# Altium PCB MLX_Thermometer.PcbDoc
Units mm, origin at the board's own origin, x right, y up, seen from the top; angles counter-clockwise.
Board outline 25.04 x 51.52 mm, 2 copper layers (Top Layer, Bottom Layer); 87 components, 49 nets, 275 pads, 164 vias.
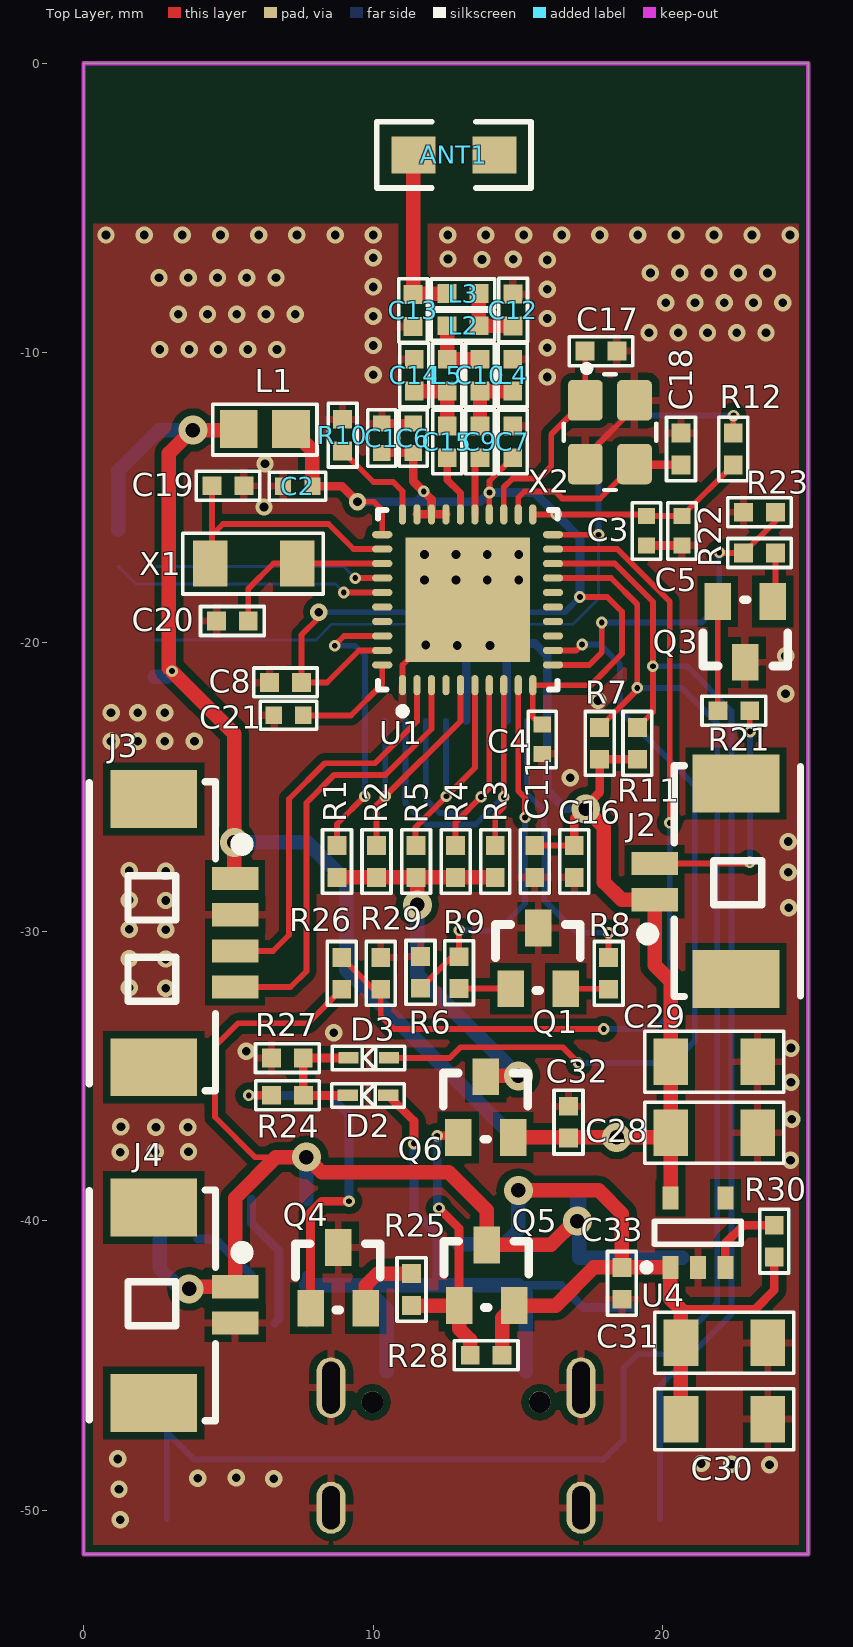
[diagram p0: Top Layer view]
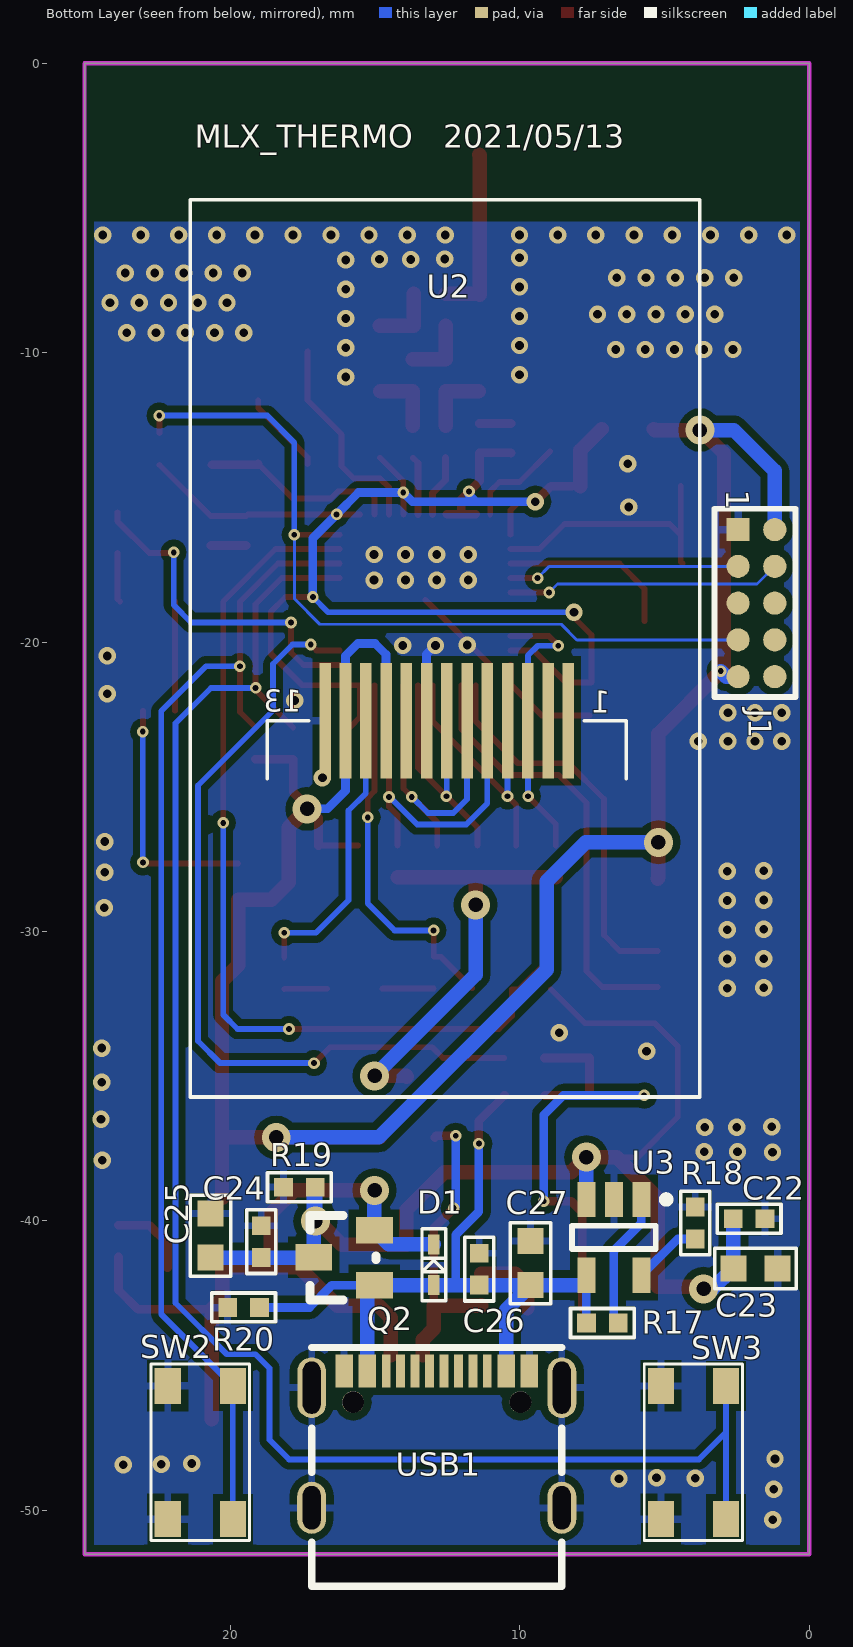
[diagram p1: Bottom Layer view, seen from below]
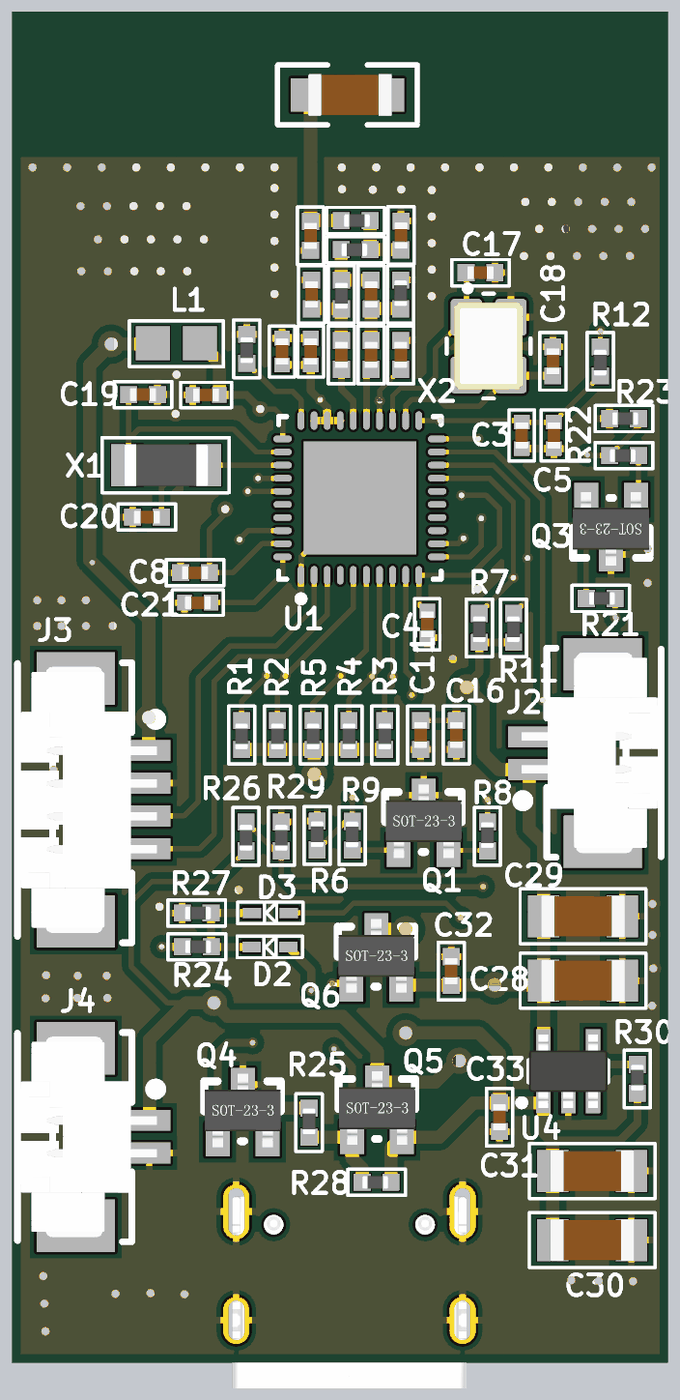
[diagram p2: 3D render of the assembled board from above, using the file's embedded part models]
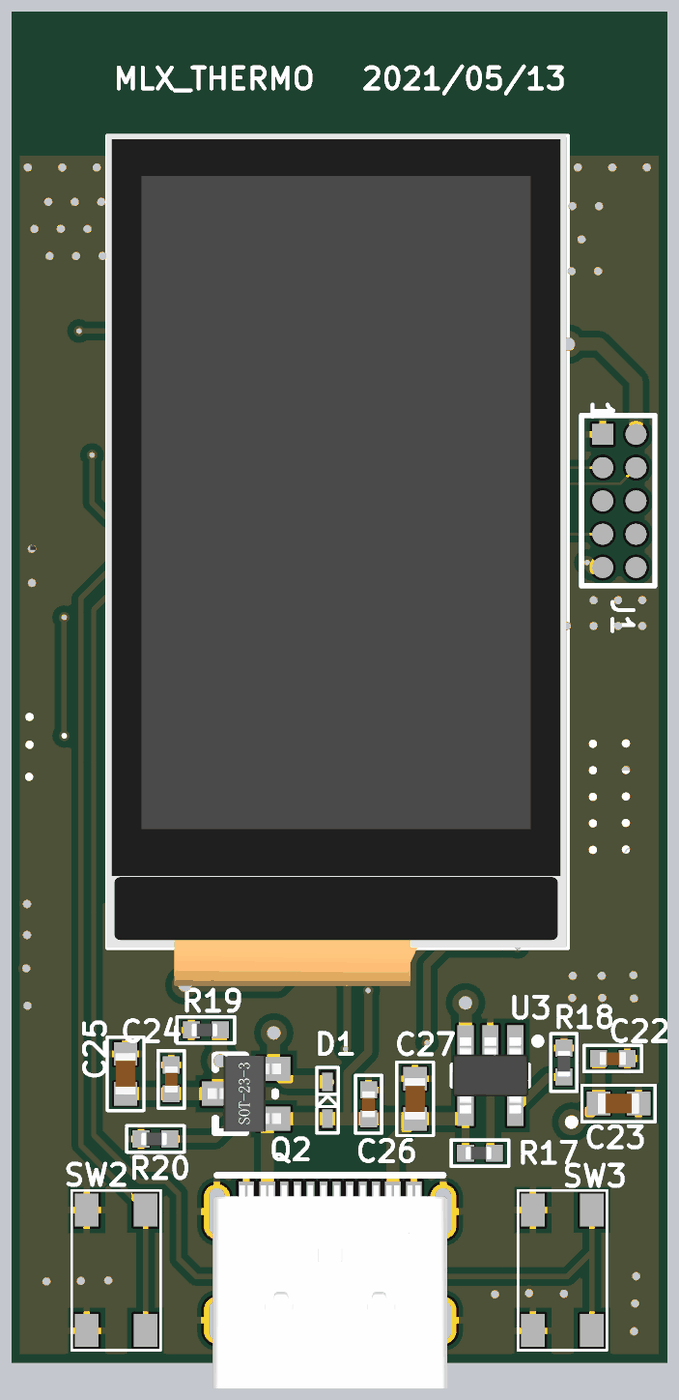
[diagram p3: 3D render of the assembled board from below, using the file's embedded part models]

## Layer stack, top to bottom
Top Solder: solder mask 0.0102, Solder Resist, Dk 3.5
Top Layer: signal copper 0.0356
Dielectric 1: dielectric 0.32, FR-4, Dk 4.8
Bottom Layer: signal copper 0.0356
Bottom Solder: solder mask 0.0102, Solder Resist, Dk 3.5

## Board outline
0,-51.52 25.04,-51.52 25.04,0 0,0

## Design rules (kind name [scope] priority, off if disabled: settings)
Clearance Clearance_poly [InPoly] p1: gap=0.25
Clearance [All] p2: gap=0.1
HoleToHoleClearance [All] p1: gap=0 allowstackedmicrovias=TRUE
MinimumSolderMaskSliver [All] p1: minsoldermaskwidth=0
PolygonConnect PolygonConnect_via [IsVia] p1: connectstyle=Direct reliefconductorwidth=0.254 reliefentries=4 polygonreliefangle="90 Angle" airgapwidth=0.254
PolygonConnect [All] p2: connectstyle=Relief reliefconductorwidth=0.254 reliefentries=4 polygonreliefangle="90 Angle" airgapwidth=0.254
RoutingVias [All] p1: holewidth=0.3 width=0.6 viastyle="Through Hole" minholewidth=0.2 minwidth=0.4 maxholewidth=0.711 maxwidth=1.27
SilkToSilkClearance [All] p1: silktosilkclearance=0
SilkToSolderMaskClearance [IsPad] p1: minsilkscreentomaskgap=0 clearancetoexposedcopper=TRUE
SolderMaskExpansion [All] p1: expansion=0.102
Width [All] p1: maxlimit=1 minlimit=0.1 preferedwidth=0.254
26 further rules are at their usual default settings.

## Components (designator, comment, footprint, x,y, rotation, side; value= is the part's Value field where it differs from the comment)
ANT1 "AN3216" AN3216 12.795,-3.17 r180 top
C1 "1uF" CAP-0402 10.3,-13.466 r90 top
C2 "100nF" CAP-0402 7.905,-14.615 r180 top
C3 "100nF" CAP-0402 19.45,-15.65 r270 top
C4 "100nF" CAP-0402 15.845,-22.853 r270 top
C5 "100nF" CAP-0402 20.675,-15.65 r270 top
C6 "100nF" CAP-0402 11.395,-13.465 r90 top
C7 "220pF" CAP_0402 14.83,-13.085 r90 top
C8 "2.2uF" CAP_0402 6.975,-21.395 r0 top
C9 "18pF" CAP_0402 13.697,-13.085 r90 top
C10 "1pF" CAP_0402 13.697,-10.78 r90 top
C11 "100nF" CAP_0402 15.588,-27.585 r90 top
C12 "1pF" CAP_0402 14.84,-8.53 r270 top
C13 "NC" CAP_0402 11.385,-8.545 r90 top
C14 "1pF" CAP_0402 11.425,-10.78 r90 top
C15 "18pF" CAP_0402 12.564,-13.085 r90 top
C16 "100nF" CAP_0402 16.955,-27.585 r90 top
C17 "27pF" CAP_0402 17.875,-9.95 r180 top
C18 "27pF" CAP_0402 20.64,-13.33 r270 top
C19 "15pF" CAP_0402 4.99,-14.6 r180 top
C20 "15pF" CAP_0402 5.14,-19.275 r0 top
C21 "100nF" CAP-0402 6.574,-22.535 r0 top
C22 "100nF" CAP_0402 2.075,-39.925 r0 bottom
C23 "10uF/16V" CAP-0603 1.095,-41.64 r0 bottom
C24 "100nF" CAP_0402 18.935,-40.72 r270 bottom
C25 "10uF/16V" CAP-0603 20.68,-39.746 r270 bottom
C26 "100nF" CAP_0402 11.4,-41.67 r270 bottom
C27 "10uF/16V" CAP-0603 9.625,-40.696 r270 bottom
C28 "47uF/16V" CAP-1206 21.79,-36.955 r0 top
C29 "22uF/16V" CAP-1206 21.79,-34.5 r0 top
C30 "47uF/16V" CAP-1206 22.14,-46.85 r0 top
C31 "22uF/16V" CAP-1206 22.14,-44.215 r0 top
C32 "100nF" CAP_0402 16.755,-36.59 r270 top
C33 "100nF" CAP_0402 18.6,-42.16 r90 top
D1 "1N5819" SOD523 12.97,-41.58 r90 bottom
D2 "1N4148" SOD523-3D 10.53,-35.665 r180 top
D3 "1N4148" SOD523-3D 10.55,-34.37 r180 top
J1 "DEBUG" HEADER2X5 2.46,-18.655 r270 bottom
J2 "Buzzer" "MX 1.25-WS-2P" 22.54,-28.265 r90 top
J3 "MLX" "MX 1.25-WS-4P" 2.425,-30.06 r270 top
J4 "Battery" "MX 1.25-WS-2P" 2.425,-42.915 r270 top
L1 "30R/600mA" IND_0805_SMD 6.265,-12.64 r180 top
L2 "1nH" Inductor_0402_3D 13.11,-9.075 r0 top
L3 "1nH" Inductor_0402_3D 13.11,-7.96 r180 top
L4 "2nH" Inductor_0402_3D 14.83,-10.78 r270 top
L5 "2nH" Inductor_0402_3D 12.564,-10.78 r90 top
Q1 "S8050" SOT23_2 14.735,-31.895 r0 top
Q2 "Si2307" SOT23_2 15.113,-42.238 r90 bottom
Q3 "2SC2712" SOT23_2 23.83,-18.69 r180 top
Q4 "PMBT3904" SOT23_2 7.824,-42.93 r0 top
Q5 "Si2301" SOT23_2 12.955,-42.84 r0 top
Q6 "Si2301" SOT23_2 12.924,-37.03 r0 top
R1 "10K" RES_0402 8.755,-27.585 r90 top
R2 "10K" RES_0402 10.122,-27.585 r90 top
R3 "10K" RES_0402 14.222,-27.585 r90 top
R4 "10K" RES_0402 12.855,-27.585 r90 top
R5 "10K" RES_0402 11.488,-27.585 r90 top
R6 "100K" RES_0402 11.64,-31.415 r270 top
R7 "100K" RES_0402 17.83,-23.5 r90 top
R8 "20R" RES_0402 18.14,-31.45 r270 top
R9 "1K" RES_0402 12.975,-31.425 r270 top
R10 "56k" RES_0402 8.95,-12.855 r90 top
R11 "100K" RES_0402 19.135,-23.5 r90 top
R12 "4.7K" RES_0402 22.45,-13.33 r90 top
R17 "2K" RES_0402 7.15,-43.53 r180 bottom
R18 "2K" RES_0402 3.94,-40.075 r90 bottom
R19 "100K" RES_0402 17.615,-38.835 r180 bottom
R20 "100K" RES_0402 19.54,-42.99 r180 bottom
R21 "51R" RES_0402 22.465,-22.375 r180 top
R22 "1K" RES_0402 23.355,-16.925 r0 top
R23 "4.7K" RES_0402 23.355,-15.515 r180 top
R24 "10K" RES_0402 7.045,-35.66 r180 top
R25 "1K" RES_0402 11.33,-42.37 r270 top
R26 "510K" RES_0402 8.92,-31.45 r90 top
R27 "100K" RES_0402 7.04,-34.375 r180 top
R28 "100K" RES_0402 13.91,-44.645 r0 top
R29 "510K" RES_0402 10.27,-31.45 r90 top
R30 "100K" RES_0402 23.865,-40.7 r270 top
SW2 "UP" SW_TVAF02A 21.04,-48 r90 bottom
SW3 "DOWN" SW_TVAF02A 4,-48 r90 bottom
U1 "CC2541" QFN50P600X600-40WL 13.27,-18.54 r90 top
U2 "114-IPS" 144-IPS 12.52,-22.685 r180 bottom locked
U3 "TP4054" TP4054 6.75,-40.57 r270 bottom
U4 "AP2112K-3.3V" AP2112K 21.225,-40.41 r90 top
USB1 "USB TYPE-C3.1" USB-C 12.87,-47.55 r180 bottom
X1 "32.768KHz" Crystal1206 5.88,-17.29 r0 top
X2 "32M 15PPM" CRYSTAL_4-LCC 18.185,-12.75 r270 top

## Footprints (in the part's own frame and the unit in brackets; to place one, negate y for a bottom-side part, rotate by r counter-clockwise, add the part's x,y. Pads: shape width x height; smd on the part's side, far side on the other; paste and mask are expansions set on the pad)
144-IPS [mm] "1.44 TFT IPS"
  rect 0.4x4 smd: 1(4.198,-0.035) 2(3.498,-0.035) 3(2.798,-0.035) 4(2.098,-0.035) 5(1.398,-0.035) 6(0.698,-0.035) 7(-0.002,-0.035) 8(-0.702,-0.035) 9(-1.402,-0.035) 10(-2.102,-0.035) 11(-2.802,-0.035) 12(-3.502,-0.035) 13(-4.202,-0.035)
  silkscreen extent -8.86,-13.04 8.74,17.96, body extent -8.9,-14.46 8.66,18.03, height 3.27
AN3216 [mil]
  rect 60x50 smd: 1(-55,0) 2(55,0)
  silkscreen extent -105,-45 105,45, body extent -67,-31 59,31, height 37
AP2112K [mm]
  rect 0.8x0.55 smd: 1(-1.2,0.95) 2(-1.2,0) 3(-1.2,-0.95) 4(1.2,-0.95) 5(1.2,0.95)
  silkscreen extent -1.32,-1.5 0.4,1.9, body extent -1.4,-1.5 1.4,1.5, height 1.1
CAP-0402 [mm]
  rect 0.56x0.6 smd mask+0.07: 1(0,0) 2(1.016,0)
  silkscreen extent -0.47,-0.49 1.48,0.49, body extent 0.01,-0.25 1.01,0.25, height 0.49
CAP-0603 [mm]
  rect 0.9x0.9 smd mask+0.07: 1(0,0) 2(1.524,0)
  silkscreen extent -0.64,-0.7 2.16,0.7, body extent -0.04,-0.4 1.56,0.4, height 0.6
CAP-1206 [mm] "Chip SMD component 1206; Body 3.2 x 1.6 mm (LxW typ)"
  rect 1.2x1.6 smd mask+0.05: 1(-1.5,0) 2(1.5,0)
  silkscreen extent -2.4,-1.05 2.4,1.05, body extent -1.6,-0.8 1.6,0.8, height 0.95
CAP_0402 [mm]
  rect 0.65x0.65 smd mask+0.05: 1(-0.55,0) 2(0.55,0)
  silkscreen extent -1.1,-0.5 1.1,0.5, body extent -0.5,-0.25 0.5,0.25, height 0.5
Crystal1206 [mm] "Chip SMD component 1206; Body 3.2 x 1.6 mm (LxW typ)"
  rect 1.2x1.6 smd mask+0.05: 1(-1.5,0) 2(1.5,0)
  silkscreen extent -2.45,-1.05 2.4,1.05, body extent -1.6,-0.8 1.6,0.8, height 0.6
CRYSTAL_4-LCC [mm] "SMD Crystal 4-lead leadless package"
  round 0.508 on Mech15: 0(0,0)
  rrect25% 1.4x1.2 smd: 1(-1.1,-0.85) 2(1.1,-0.85) 3(1.1,0.85) 4(-1.1,0.85)
  silkscreen extent -2.3,-1.6 2,1.6, body extent -1.65,-1.3 1.65,1.3, height 0.8
HEADER2X5 [mm]
  rect 0.8x0.8 smd: 1(-2.54,0)
  round 0.8 smd: 2(-2.54,1.27) 3(-1.27,0) 4(-1.27,1.27) 5(0,0) 6(0,1.27) 7(1.27,0) 8(1.27,1.27) 9(2.54,0) 10(2.54,1.27)
  silkscreen extent -3.26,-0.81 3.24,1.99
IND_0805_SMD [mm]
  rect 1.3x1.3 smd mask+0.05: 1(-0.9,0) 2(0.9,0)
  silkscreen extent -1.8,-0.85 1.8,0.9, body extent -0.92,-0.53 1.02,0.53, height 0.9
Inductor_0402_3D [mm] "Chip SMD component 402; Body 1.0 x 0.5 mm (LxW typ)"
  rect 0.65x0.65 smd mask+0.05: 1(-0.55,0) 2(0.55,0)
  silkscreen extent -1.1,-0.5 1.1,0.5, body extent -0.55,-0.25 0.45,0.25, height 0.38
"MX 1.25-WS-2P" [mm] "长：7.65mm，宽：4.2mm，高：3.4mm"
  rect 2x3 smd: 0(-3.382,0) 0(3.382,0)
  rect 0.8x1.6 smd: 1(-0.639,2.811) 2(0.611,2.811)
  silkscreen extent -3.98,-2.23 4,3.25, body extent -3.83,-2.1 3.83,3.09, height 3.4
"MX 1.25-WS-4P" [mm] "长：10.15mm，宽：4.2mm，高：3.4mm"
  rect 2x3 smd: 0(-4.632,0) 0(4.632,0)
  rect 0.8x1.6 smd: 1(-1.889,2.811) 2(-0.639,2.811) 3(0.611,2.811) 4(1.861,2.811)
  silkscreen extent -5.23,-2.23 5.45,3.25, body extent -5.07,-2.1 5.07,3.09, height 3.4
QFN50P600X600-40WL [mm] "QFN, 40-Leads, Body 6x6mm, Pitch 0.5mm, IPC High Density"
  oval 0.7x0.25 smd: 1(-2.95,2.25) 2(-2.95,1.75) 3(-2.95,1.25) 4(-2.95,0.75) 5(-2.95,0.25) 6(-2.95,-0.25) 7(-2.95,-0.75) 8(-2.95,-1.25) 9(-2.95,-1.75) 10(-2.95,-2.25) 21(2.95,-2.25) 22(2.95,-1.75) 23(2.95,-1.25) 24(2.95,-0.75) 25(2.95,-0.25) 26(2.95,0.25) 27(2.95,0.75) 28(2.95,1.25) 29(2.95,1.75) 30(2.95,2.25)
  oval 0.25x0.7 smd: 11(-2.25,-2.95) 12(-1.75,-2.95) 13(-1.25,-2.95) 14(-0.75,-2.95) 15(-0.25,-2.95) 16(0.25,-2.95) 17(0.75,-2.95) 18(1.25,-2.95) 19(1.75,-2.95) 20(2.25,-2.95) 31(2.25,2.95) 32(1.75,2.95) 33(1.25,2.95) 34(0.75,2.95) 35(0.25,2.95) 36(-0.25,2.95) 37(-0.75,2.95) 38(-1.25,2.95) 39(-1.75,2.95) 40(-2.25,2.95)
  rect 4.3x4.3 smd: 41(0,0)
  silkscreen extent -3.97,-3.1 3.1,3.1, body extent -3.08,-3.08 3.08,3.08, height 1
RES_0402 [mm] "Chip SMD component 402; Body 1.0 x 0.5 mm (LxW typ)"
  rect 0.65x0.65 smd mask+0.05: 1(-0.55,0) 2(0.55,0)
  silkscreen extent -1.1,-0.5 1.1,0.5, body extent -0.55,-0.25 0.45,0.25, height 0.38
SOD523 [mm] "SODFL, 2-Leads, Body 0.85x1.65mm, IPC Medium Density"
  rect 0.7x0.4 smd: 1(-0.635,0) 2(0.765,0)
  silkscreen extent -1.18,-0.41 1.32,0.41, body extent -0.7,-0.35 0.87,0.35, height 0.74
SOD523-3D [mm]
  rect 0.7x0.4 smd: 1(0,0) 2(1.4,0)
  silkscreen extent -0.55,-0.41 1.95,0.41, body extent -0.07,-0.35 1.51,0.35, height 0.74
SOT23_2 [mil]
  rect 36x50 smd: 1(0.69,-3.47) 2(75.5,-3.47) 3(38.41,79.13)
  silkscreen extent -20,-6 95,84, body extent -19,-15 95,95, height 47
SW_TVAF02A [mm]
  rect 1.25x0.9 smd: 1(-2.3,1.125) 2(2.3,1.125) 3(-2.3,-1.125) 4(2.3,-1.125)
  silkscreen extent -3.05,-1.7 3.05,1.7, body extent -1.8,-1.4 1.8,1.4, height 2.5
TP4054 [mm] "SOT23, 5-Leads, Body 2.90x2.90mm, Pitch 0.95mm, IPC Medium Density"
  rect 1.22x0.62 smd: 1(-1.31,0.95) 2(-1.31,0) 3(-1.31,-0.95) 4(1.31,-0.95) 5(1.31,0.95)
  silkscreen extent -1.43,-1.45 0.4,1.93, body extent -1.45,-1.45 1.45,1.45, height 1
USB-C [mm]
  rect 0.6x1.15 smd: A1/B12(-3.2,2.363) A4/B9(-2.4,2.363) A9/B4(2.4,2.363) A12/B1(3.2,2.363)
  rect 0.3x1.15 smd: A5(-1.25,2.363) A6(-0.25,2.363) A7(0.25,2.363) A8(-1.75,2.363) B5(1.75,2.363) B6(0.75,2.363) B7(-0.75,2.363) B8(1.25,2.363)
  oval 1x2.099 hole 0.61 slot 1.8 at 90 deg: G1(-4.32,1.787) G2(4.32,1.787)
  oval 1x1.799 hole 0.61 slot 1.5 at 90 deg: G3(-4.32,-2.363) G4(4.32,-2.363)
  round 0.75 hole 0.75 unplated: ""(-2.89,1.288) ""(2.89,1.288)
  silkscreen extent -4.32,-5.08 4.32,3.18, body extent -4.48,-4.95 4.47,2.8, height 0.5

## Part data
ANT1: library part CAP, "AN3216-245 2.4G BLE Antenna"
C1 C2 C3 C4 C5 C6 C7 C8 C9 C10 C11 C12 C13 C14 C15 C16 C17 C18 C19 C20 C21 C22 C23 C24 C25 C26 C27 C32 C33: library part CAP, "Capacitor"
C28 C29 C30 C31: library part CAP_POLAR, "Capacitor"
D1: library part ZENER, "ZENER DIODE"
D2 D3: library part DIODE, "DIODE SCHOTTKY"
J1: library part Header2x5
J2 J4: library part HEADER2_1
J3: library part HEADER4
L1: library part Inductor, "FIXED IND 4.7UH 600MA 180 MOHM"
L2 L3: library part INDUCTOR, "FIXED IND 1NH 1.2A 30 MOHM SMD"
L4 L5: library part INDUCTOR, "FIXED IND 2NH 900MA 150 MOHM SMD"
Q1 Q3 Q4: library part NPN, "NPN BJT"
Q2 Q5 Q6: library part MOS-P-D, "P-Channel Mosfet 20V/4.3A"
R1 R2 R3 R4 R5 R6 R7 R8 R9 R10 R11 R12 R17 R18 R19 R20 R22 R23 R24 R25 R26 R27 R28 R29 R30: library part RES, "Resistor"
R21: library part Res2, "Resistor"
SW2 SW3: library part 1-1825910-4, "Tactile Switch SPST-NO Top Actuated Surface Mount"
U1: "IC RF TXRX+MCU BLUETOOTH 40VFQFN"
U2: "1.14 TFT IPS"
USB1: "CONN RCP USB3.1 TYPEC SMD"
X1: library part CRYSTAL, "CRYSTAL 32.7680 KHZ 12.5PF SMD"
X2: library part CRYSTAL_40M, "CRYSTAL 32.0000MHZ 10PF SMD"

## Via types
v1: diameter 0.6, hole 0.3, Top Layer to Bottom Layer, tented both sides, 121 vias
v2: diameter 0.4, hole 0.2, Top Layer to Bottom Layer, tented both sides, 33 vias
v3: diameter 1, hole 0.5, Top Layer to Bottom Layer, tented both sides, 10 vias

## Nets (pads, with @x,y where several pads share a name; then routed paths per layer and width w, separated by ;. In a path a pad name is that pad's centre, name@x,y a point inside that pad or via, vN(x,y) a via of type N, cw(c..) or ccw(c..) an arc to the next point about the centre after c; other vN are vias at no path point)
BAT-SEN: R26.2 R29.1 U1.19 | length 32.2
  Top Layer w0.2: R26.2 10.02,-32 R29.1 10.27,-32.925 10.715,-33.37 v2(17.975,-33.37) ; U1.19 18.44,-16.79 20.25,-18.6 v2(20.25,-26.25)
  Bottom Layer w0.2: v2(17.975,-33.37) 19.755,-33.37 20.25,-32.875 v2(20.25,-26.25)
BTN_DOWN: R7.2 SW3.3 SW3.4 U1.17 | length 59.1
  Top Layer w0.2: U1.17 18.225,-17.79 19.13,-18.695 v2(19.13,-21.585) 19.13,-21.65 R7.2
  Bottom Layer w0.2: SW3.3 2.875,-47.305 ; SW3.4 2.875,-47.305 ; v2(19.13,-21.585) 20.67,-21.585 21.895,-22.81 21.895,-42.835 20.125,-44.605 19.135,-44.605 18.65,-45.09 18.65,-47.565 17.975,-48.24 3.81,-48.24 2.875,-47.305
BTN_UP: R11.2 SW2.3 SW2.4 U1.18 | length 40.9
  Top Layer w0.2: U1.18 18.355,-17.29 19.67,-18.605 v2(19.67,-20.835) 19.67,-22.415 R11.2
  Bottom Layer w0.2: v2(19.67,-20.835) 20.845,-20.835 22.39,-22.38 22.39,-43.225 SW2.4 SW2.3
BUZZER: R22.1 R23.1 U1.11 | length 11.7
  Top Layer w0.2: U1.11 17.475,-20.79 17.905,-20.36 v2(17.905,-19.325) ; v2(21.96,-16.905) 21.98,-16.925 R22.1 23.905,-15.825 R23.1
  Bottom Layer w0.2: v2(17.905,-19.325) 21.36,-19.325 21.96,-18.725 v2(21.96,-16.905)
BVDD: C1.1 C2.1 C3.1 C4.1 C5.1 C6.1 C7.1 C8.2 L1.1 R12.1 U1.10 U1.21 U1.24 U1.27 U1.28 U1.29 U1.31 U1.39 | length 54.4
  Top Layer w0.2: v1(8.13,-18.97) 8.13,-19.15 7.525,-19.755 C8.2 8.41,-21.395 9.515,-20.29 U1.39 ; v1(9.465,-15.15) 10.025,-15.15 10.32,-15.445 U1.31 ; U1.24 14.02,-14.875 14.06,-14.835 v2(14.025,-14.835) 14.025,-14.44 C7.1 ; U1.21 v2(16.33,-15.59) 19.39,-15.59 C3.1 C5.1 22.445,-13.88 R12.1 ; C4.1@15.845,-22.92 15.52,-22.595 U1.10 17.52,-21.49 18.605,-20.405 18.605,-18.955 18.095,-18.445 v2(17.15,-18.445)
  Top Layer w0.3: 8.205,-14.615 8.93,-14.615 v1(9.465,-15.15) ; C1.1 10.301,-13.465 C6.1 11.395,-14.45 12.02,-15.075 U1.28 ; U1.29 U1.28 ; U1.27 U1.28
  Top Layer w0.5: L1.1 7.905,-13.38 C2.1
  Bottom Layer w0.2: v1(8.13,-18.97) 16.625,-18.97 v2(17.15,-18.445)
  Bottom Layer w0.3: v1(9.465,-15.15) 11.515,-15.15 ; v2(11.755,-14.795) 11.755,-14.91 11.515,-15.15 ; v2(17.15,-18.445) 17.15,-16.41 v2(16.33,-15.59) 15.575,-14.835 v2(14.025,-14.835) 13.71,-15.15 11.515,-15.15
DBG_DC: J1.3 U1.34 | length 8
  Top Layer w0.2: v2(9.385,-17.79) U1.34
  Bottom Layer w0.1: J1.3 8.98,-17.385 v2(9.385,-17.79)
DBG_DD: J1.4 U1.35 | length 9.5
  Top Layer w0.2: v2(8.99,-18.29) U1.35
  Bottom Layer w0.1: J1.4 1.805,-18 8.7,-18 v2(8.99,-18.29)
GND: C1.2 C2.2 C3.2 C4.2 C5.2 C6.2 C7.2 C8.1 C11.1 C12.1 C13.1 C14.2 C16.1 C17.1 C18.1 C19.1 C20.1 C21.1 C22.1 C23.1 C24.1 C25.1 C26.1 C27.1 C28.2 C29.2 C30.2 C31.2 C32.1 C33.1 J1.1 J3.2 J4.2 L4.1 Q1.3 Q3.3 Q4.3 R6.1 R10.2 R18.2 R19.1 R20.1 R23.2 R27.2 R29.2 SW2.1 SW2.2 SW3.1 SW3.2 U1.1 U1.41 U2.8 U2.13 U3.2 U4.2 USB1.A1/B12 USB1.A12/B1 USB1.G1 USB1.G2 USB1.G3 USB1.G4 X2.2 X2.4 | length 11.8
  Top Layer w0.2: U1.1 11.02,-20.79 U1.41 ; X2.2 17.335,-13.615 19.035,-11.915 X2.4
  Top Layer w0.3: C1.2 10.301,-12.449 C6.2 ; C3.2 C5.2
  Bottom Layer w0.3: v1(12.915,-20.12) 13.222,-20.427 U2.8
  other v1: 1.265,-50.33 1.225,-49.27 6.575,-48.915 3.94,-48.895 5.275,-48.875 22.385,-48.405 23.7,-48.425 21.34,-48.385 1.185,-48.225 24.425,-37.91 1.27,-37.63 2.48,-37.61 3.625,-37.61 1.29,-36.745 2.5,-36.765 3.605,-36.765 24.47,-36.485 24.44,-35.21 5.62,-34.135 24.44,-34.03 8.64,-33.495 1.575,-31.95 2.835,-31.965 2.835,-30.954 1.575,-30.939 2.835,-29.943 1.575,-29.927 24.36,-29.18 2.835,-28.931 1.575,-28.916 24.345,-27.955 1.575,-27.905 2.835,-27.92 24.345,-26.895 16.82,-24.69 0.95,-23.425 1.875,-23.425 2.81,-23.425 3.83,-23.425 0.95,-22.445 1.875,-22.445 2.81,-22.445 17.775,-22.02 24.255,-21.785 24.255,-20.48 11.82,-20.105 14.045,-20.12 11.78,-17.86 12.865,-17.86 13.95,-17.86 15.035,-17.86 11.78,-16.975 12.865,-16.975 13.95,-16.975 15.035,-16.975 6.235,-15.335 6.27,-13.84 16.015,-10.845 10.01,-10.765 2.635,-9.895 3.646,-9.895 4.658,-9.895 5.669,-9.895 6.68,-9.895 16.015,-9.834 10.01,-9.754 19.535,-9.315 20.546,-9.315 21.558,-9.315 22.569,-9.315 23.58,-9.315 16.015,-8.822 10.01,-8.742 3.27,-8.68 4.281,-8.68 5.293,-8.68 6.304,-8.68 7.315,-8.68 20.115,-8.28 21.126,-8.28 22.137,-8.28 23.149,-8.28 24.16,-8.28 16.015,-7.811 10.01,-7.731 2.605,-7.41 3.616,-7.41 4.628,-7.41 5.639,-7.41 6.65,-7.41 19.585,-7.25 20.596,-7.25 21.608,-7.25 22.619,-7.25 23.63,-7.25 16.015,-6.8 13.765,-6.785 14.85,-6.775 12.59,-6.765 10.01,-6.72 0.775,-5.935 2.094,-5.935 3.414,-5.935 4.733,-5.935 6.052,-5.935 7.371,-5.935 8.691,-5.935 10.01,-5.935 12.58,-5.935 13.894,-5.935 15.209,-5.935 16.523,-5.935 17.838,-5.935 19.152,-5.935 20.467,-5.935 21.781,-5.935 23.096,-5.935 24.41,-5.935
LCD-CS: R5.2 U1.6 U2.7 | length 9.1
  Top Layer w0.2: R5.2@11.465,-27.035 11.465,-26.4 v2(12.535,-25.33) 13.52,-24.345 U1.6
  Bottom Layer w0.2: U2.7 12.522,-25.362 v2@12.535,-25.375
LCD-K: R6.2 R9.1 U1.9 | length 13
  Top Layer w0.2: R6.2 12.73,-30.875 R9.1 12.975,-29.97 v2(12.98,-29.965) ; U1.9 15.02,-25.145 15.255,-25.38 v2(15.255,-26.06)
  Bottom Layer w0.2: v2(12.98,-29.965) 14.325,-29.965 15.255,-29.035 v2(15.255,-26.06)
LCD-RS: R3.2 U1.8 U2.5 | length 12.6
  Top Layer w0.2: R3.2 14.222,-25.988 14.52,-25.69 v2(14.52,-25.355) U1.8
  Bottom Layer w0.2: U2.5 11.122,-25.577 11.85,-26.305 13.545,-26.305 14.495,-25.355 v2(14.52,-25.355)
LCD-RST: R4.2 U1.7 U2.6 | length 11.1
  Top Layer w0.2: R4.2 12.855,-26.23 v2(13.735,-25.35) 14.02,-25.065 U1.7
  Bottom Layer w0.2: U2.6 11.822,-25.432 12.3,-25.91 13.175,-25.91 v2(13.735,-25.35)
LCD-SCL: R2.2 U1.5 U2.4 | length 9.4
  Top Layer w0.2: R2.2@10.122,-27.04 R2.2@10.124,-27.038 ; R2.2 10.122,-25.633 v2(10.425,-25.33) 13.02,-22.735 U1.5
  Bottom Layer w0.1: v2@10.422,-25.333 v2(10.425,-25.33)
  Bottom Layer w0.2: v2@10.422,-25.333 U2.4
LCD-SDA: R1.2 U1.38 U2.3 | length 10
  Top Layer w0.2: v2(8.675,-20.13) 8.675,-20.115 9,-19.79 U1.38 ; R1.2@8.755,-27.04 R1.2 8.755,-26.29 v2(9.715,-25.33)
  Bottom Layer w0.2: v2(8.675,-20.13) 9.382,-20.13 9.722,-20.47 U2.3 9.722,-25.323 v2(9.715,-25.33)
MLX_SCL: J3.3 U1.2 | length 13.6
  Top Layer w0.2: J3.3 6.549,-30.671 7.095,-30.125 7.095,-25.42 8.33,-24.185 10.07,-24.185 11.52,-22.735 U1.2
MLX_SDA: J3.4 U1.3 | length 15.4
  Top Layer w0.2: J3.4 7.154,-31.921 7.7,-31.375 7.7,-25.555 8.665,-24.59 10.435,-24.59 12.02,-23.005 U1.3
NetANT1_2: ANT1.2 C13.2 L3.2 | length 6
  Top Layer w0.254: C13.2 C13.2@11.42,-7.96
  Top Layer w0.5: C13.2 11.385,-3.183 ANT1.2 ; C13.2@11.42,-7.96 L3.2
NetC9_1: C9.1 U1.25 | length 2
  Top Layer w0.2: C9.1@13.52,-13.812 C9.1
  Top Layer w0.25: U1.25 C9.1@13.52,-13.812
NetC9_2: C9.2 C10.1 L4.2 | length 2.3
  Top Layer w0.5: C9.2 C10.1 L4.2
NetC10_2: C10.2 L2.1 L5.2 | length 2.3
  Top Layer w0.2: L5.2@12.56,-10.226 L5.2
  Top Layer w0.5: L5.2@12.56,-10.226 L2.1 ; L5.2 C10.2
NetC12_2: C12.2 L2.2 L3.1 | length 2.3
  Top Layer w0.2: C12.2@14.835,-9.075 C12.2
  Top Layer w0.5: L3.1 L2.2 C12.2@14.835,-9.075
NetC14_1: C14.1 C15.2 L5.1 | length 2.3
  Top Layer w0.5: C14.1 L5.1 C15.2
NetC15_1: C15.1 U1.26 | length 2.1
  Top Layer w0.25: C15.1 12.564,-14.399 13.02,-14.855 U1.26
NetC17_2: C17.2 U1.23 X2.1 | length 7.3
  Top Layer w0.2: U1.23 14.52,-14.655 14.82,-14.355 15.73,-14.355 16.16,-13.925 16.16,-12.825 X2.1 17.335,-9.96 C17.2
NetC18_2: C18.2 U1.22 X2.3 | length 6.9
  Top Layer w0.2: U1.22 15.02,-15.01 15.235,-14.795 16.29,-14.795 16.535,-15.04 17.845,-15.04 X2.3
  Top Layer w0.3: X2.3 19.065,-13.88 C18.2
NetC19_2: C19.2 U1.32 X1.1 | length 9.1
  Top Layer w0.2: X1.1 4.44,-17.23 4.44,-16.3 ; C19.2 4.44,-16.3 ; U1.32 9.33,-16.79 8.46,-15.92 4.82,-15.92 4.44,-16.3
NetC20_2: C20.2 U1.33 X1.2 | length 6.1
  Top Layer w0.2: C20.2 5.69,-18.16 6.56,-17.29 X1.2 U1.33
NetC21_2: C21.2 U1.40 | length 3.8
  Top Layer w0.2: C21.2 9.24,-22.535 10.32,-21.455 U1.40
NetD2_2: D2.2 D3.2 R24.1 R27.1 | length 4.4
  Top Layer w0.3: D2.2 7.6,-35.665 R24.1 7.59,-35.655 R27.1 7.595,-34.37 D3.2
NetJ2_2: J2.2 R21.1 | length 8.6
  Top Layer w0.2: J2.2 22.981,-27.654 v2(23.02,-27.615) ; R21.1 23.015,-23.085 v2(23.025,-23.095)
  Bottom Layer w0.2: v2(23.02,-27.615) 23.025,-27.61 v2(23.025,-23.095)
NetQ1_1: Q1.1 R9.2 | length 1.8
  Top Layer w0.2: R9.2 14.744,-31.975 Q1.1
NetQ1_2: Q1.2 R8.2 | length 1.5
  Top Layer w0.2: Q1.2 18.123,-31.983 R8.2
NetQ3_1: Q3.1 R22.2 | length 1.7
  Top Layer w0.2: Q3.1 23.905,-18.509 R22.2
NetQ3_2: Q3.2 R21.2 | length 3.8
  Top Layer w0.2: Q3.2 21.912,-22.372 R21.2
NetQ4_1: Q4.1 R24.2 | length 12.3
  Top Layer w0.3: v2(5.705,-35.665) 5.71,-35.66 R24.2 ; Q4.1 7.842,-39.703 8.225,-39.32 v2(9.17,-39.32)
  Bottom Layer w0.3: v2(5.705,-35.665) 8.495,-35.665 9.17,-36.34 v2(9.17,-39.32)
NetQ4_2: Q4.2 R25.1 | length 2.5
  Top Layer w0.5: Q4.2 9.742,-42.233 10.155,-41.82 R25.1
NetQ5_1: Q5.1 Q6.1 R25.2 R28.1 | length 10.5
  Top Layer w0.3: v2(12.215,-37.06) 12.884,-37.06 Q6.1 ; v2(12.28,-39.56) 12.973,-40.253 Q5.1
  Top Layer w0.5: R25.2 11.338,-42.928 Q5.1 12.973,-43.728 13.36,-44.115 R28.1
  Bottom Layer w0.3: v2(12.215,-37.06) 12.215,-39.495 v2(12.28,-39.56)
NetR8_1: R8.1 U2.11 | length 10
  Top Layer w0.2: R8.1 v2(18.14,-30.045)
  Bottom Layer w0.2: U2.11 15.322,-25.232 15.915,-25.825 15.915,-28.92 17.04,-30.045 v2(18.14,-30.045)
NetR10_1: R10.1 U1.30 | length 3.4
  Top Layer w0.2: R10.1 10.015,-14.47 10.7,-14.47 11.02,-14.79 U1.30
NetR17_2: R17.2 U3.1 | length 4.7
  Bottom Layer w0.3: U3.1 5.8,-40.085 6.75,-41.035 6.75,-43.38 R17.2
NetR18_1: R18.1 U3.5 | length 2.4
  Bottom Layer w0.3: R18.1 4.545,-40.625 U3.5
NetR30_1: R30.1 U4.3 | length 2.8
  Top Layer w0.3: U4.3 22.175,-40.775 22.8,-40.15 R30.1
PWR_EN: D3.1 U1.12 | length 28
  Top Layer w0.2: D3.1 12.655,-34.37 13.025,-34 16.56,-34 v2(17.11,-34.55) ; U1.12 17.02,-20.29 v2(17.225,-20.085)
  Bottom Layer w0.2: v2(17.11,-34.55) 20.35,-34.55 21.115,-33.785 21.115,-24.96 18.525,-22.37 18.525,-20.76 17.85,-20.085 v2(17.225,-20.085)
RESET: J1.7 R12.2 U1.20 | length 28.5
  Top Layer w0.2: U1.20 v2(17.79,-16.29) ; R12.2 22.45,-12.18 v2(22.455,-12.175)
  Bottom Layer w0.1: J1.7 8.03,-19.925 8.57,-19.385 16.91,-19.385 17.79,-18.505 v2(17.79,-16.29)
  Bottom Layer w0.2: v2(17.79,-16.29) 17.79,-13.115 18.73,-12.175 v2(22.455,-12.175)
V3V: Q6.3 R1.1 R2.1 R3.1 R4.1 R5.1 | length 14.9
  Top Layer w0.5: R1.1 R2.1 R5.1 ; v3(11.53,-29.08) 11.53,-28.177 R5.1 ; Q6.3 13.93,-34.99 v3(15.02,-34.99) ; R3.1 R4.1 R5.1
  Bottom Layer w0.5: v3(11.53,-29.08) 11.53,-31.5 v3(15.02,-34.99)
VBAT: C22.2 C23.2 C24.2 C25.2 J4.1 Q2.3 Q5.3 R19.2 R26.1 U3.3 | length 40.7
  Top Layer w0.2: 6.36,-37.8 5.925,-37.8 4.54,-36.415 4.54,-33.965 5.335,-33.17 7.75,-33.17 R26.1
  Top Layer w0.5: v3(3.65,-42.35) 3.724,-42.276 J4.1 5.236,-39.209 6.645,-37.8 v3(7.7,-37.8) 8.221,-38.321 12.616,-38.321 13.931,-39.636 Q5.3 16.15,-40.83 16.97,-40.01 v3(17.064,-40.01)
  Bottom Layer w0.5: C22.2 2.625,-41.634 3.341,-42.35 v3(3.65,-42.35) ; U3.3 v3(7.7,-37.8) ; v3(17.064,-40.01) R19.2@17.064,-39.089 ; R19.2@17.064,-38.986 R19.2@17.064,-39.089 ; C25.2 C24.2 17.131,-41.27 Q2.3 17.123,-39.148 R19.2@17.064,-39.089
VBUS: C26.2 C27.2 D1.1 D2.1 Q2.1 R17.1 R20.2 U3.4 USB1.A4/B9 USB1.A9/B4 | length 26.9
  Top Layer w0.3: D2.1 11.415,-36.55 v2(11.415,-37.33)
  Bottom Layer w0.3: R17.1 7.7,-42.225 U3.4 ; v2(11.415,-37.33) 11.415,-39.685 12.21,-40.48 12.21,-42.22 ; Q2.1 16.495,-42.22 17.265,-42.99 R20.2
  Bottom Layer w0.5: U3.4@7.7,-42.225 7.705,-42.22 C27.2 ; USB1.A9/B4 10.47,-43.065 C27.2 ; USB1.A4/B9 15.27,-42.465 Q2.1 12.21,-42.22 C26.2 C27.2
VCC-3V3: C11.2 C16.2 C28.1 C29.1 C32.2 J1.2 J1.9 J2.1 J3.1 L1.2 Q6.2 R7.1 R11.1 U2.10 U2.12 U4.5 | length 80.1
  Top Layer w0.2: C11.2 C16.2
  Top Layer w0.3: C16.2 v3@16.955,-26.07 ; v3@17.305,-25.72 17.83,-25.195 R7.1 R11.1
  Top Layer w0.5: v2@2.945,-20.9 2.945,-13.485 v3@3.79,-12.64 ; v2@3.052,-21.007 5.21,-23.165 v3(5.21,-26.92) 5.21,-28.146 J3.1 ; v3(3.775,-12.675) 5.33,-12.675 L1.2 ; Q6.2 v3(18.415,-37.118) 20.127,-37.118 C28.1 ; v3@17.305,-25.72 17.98,-26.395 17.98,-28.295 18.589,-28.904 J2.1 19.729,-31.165 20.29,-31.726 C29.1 C28.1 ; U4.5 20.29,-39.195 C28.1
  Bottom Layer w0.3: U2.10 14.622,-20.428 15,-20.05 15.595,-20.05 16.022,-20.477 U2.12 16.022,-25.142 16.645,-25.765 v3(17.35,-25.765)
  Bottom Layer w0.5: J1.2 1.19,-14.09 2.605,-12.675 v3(3.775,-12.675) ; J1.9 2.865,-21.195 v2(3.055,-21.005) ; v3(5.21,-26.92) 7.725,-26.92 9.075,-28.27 9.075,-31.325 14.868,-37.118 v3(18.415,-37.118)
VCC-5V: C30.1 C31.1 C33.2 D1.2 Q2.2 Q5.2 R28.2 R30.2 U4.1 | length 27.3
  Top Layer w0.3: 20.64,-43.05 23.205,-43.05 23.865,-42.39 R30.2
  Top Layer w0.5: R28.2 14.46,-43.341 Q5.2 16.308,-42.928 17.626,-41.61 C33.2 ; v3(15.02,-38.945) 17.8,-38.945 18.6,-39.745 C33.2 ; C30.1 C31.1 20.64,-43.05 20.275,-42.685 U4.1 C33.2
  Bottom Layer w0.5: D1.2 14.53,-40.815 Q2.2 15.025,-38.95 v3(15.02,-38.945)
pads on no net: ANT1.1 J1.5 J1.6 J1.8 J1.10 J2.0 J3.0 J4.0 U1.4 U1.13 U1.14 U1.15 U1.16 U1.36 U1.37 U2.1 U2.2 U2.9 U4.4 USB1. USB1.A5 USB1.A6 USB1.A7 USB1.A8 USB1.B5 USB1.B6 USB1.B7 USB1.B8 X2.0

## Polygon pours and split planes (outlines as drawn)
GND on Top Layer "GND_L01_P000" (solid, remove dead copper, pour order 0): 0,0 0.01,-0.01 25.025,-0.01 25.025,-51.515 25.03,-51.52 25.02,-51.53 0,-51.53
GND on Bottom Layer "GND_L02_P002" (solid, remove dead copper, pour order 2): 0,-0.005 25.025,-0.005 25.03,-0.01 25.04,-0.02 25.04,-51.525 0.005,-51.525 0,-51.52

## Keep-outs
Keep-Out Layer:
  the board outline again, w0.15

## Other copper
Top Layer:
  pour cut-out: 0,-0.005 0.01,-0.015 25.03,-0.015 25.03,-5.51 24.995,-5.545 0,-5.545
Bottom Layer:
  pour cut-out: 0.042,0.055 0.052,0.045 25.073,0.045 25.073,-5.45 25.037,-5.485 0.042,-5.485

## Silkscreen, mask and mechanical layers (free items; w line width, h text height)
Bottom Overlay:
  text "MLX_THERMO   2021/05/13" at 21.225,-2.93 h0.8

## Text inside footprints (layer, text, board x,y; h text height)
J1: Bottom Overlay "1" at 2.86,-14.735 h0.8 r90
U2: Bottom Overlay "13" at 17.533,-22.405 h0.76; Bottom Overlay "1" at 6.878,-22.448 h0.76